# Altium PCB ControlBoard_PCB.PcbDoc (part 1 of 2)
Units mil, origin at the board's own origin, x right, y up, seen from the top; angles counter-clockwise.
Board outline 1629.92 x 1653.54 mil, 2 copper layers (Top Layer, Bottom Layer), stack 57 mil thick; 87 components, 76 nets, 349 pads, 144 vias.
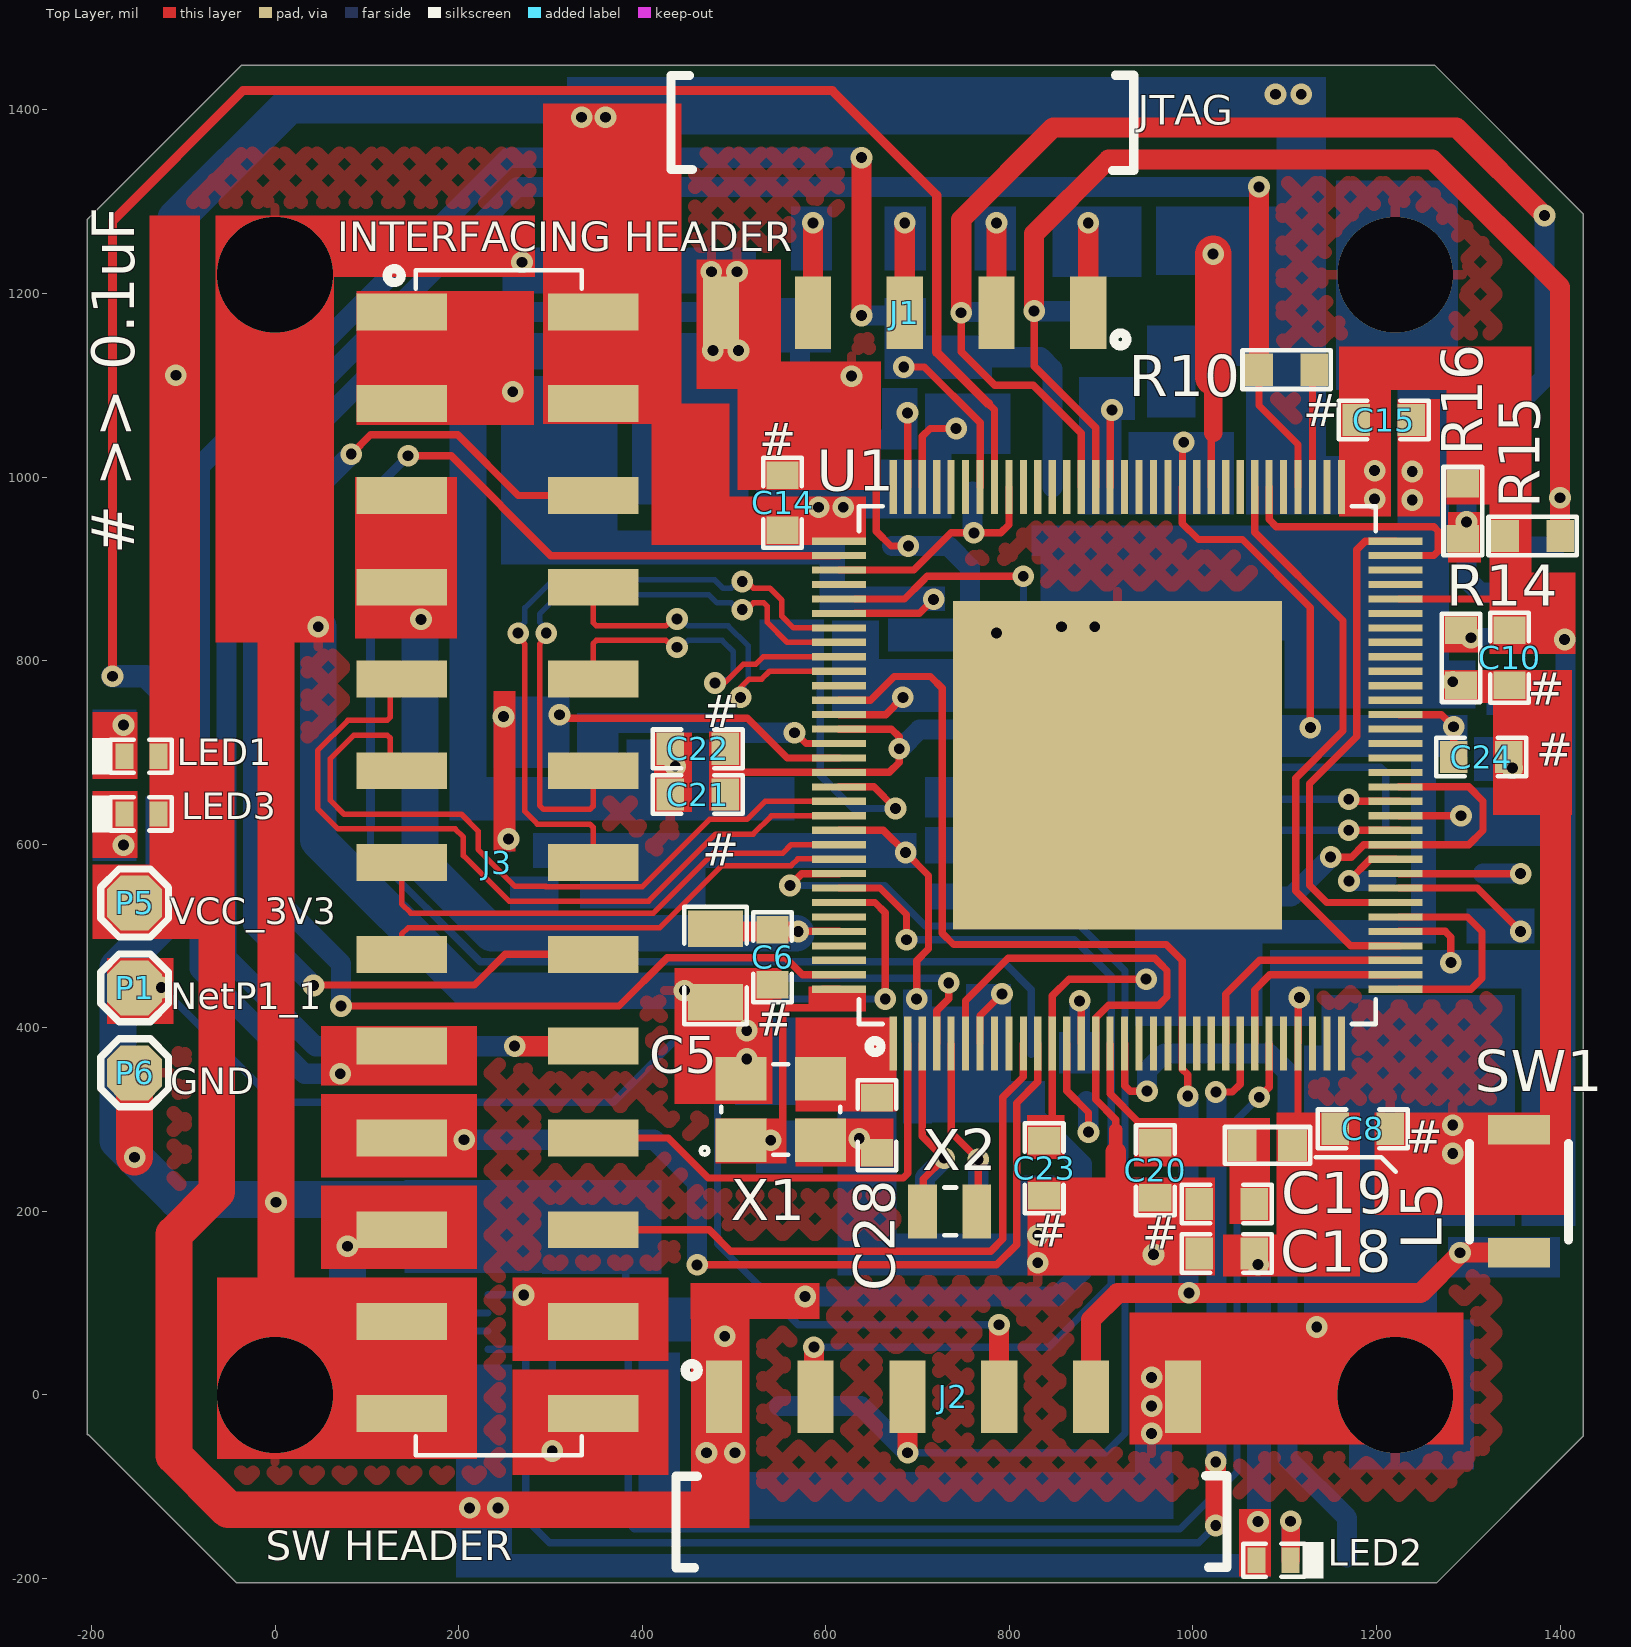
[diagram p0: Top Layer view]
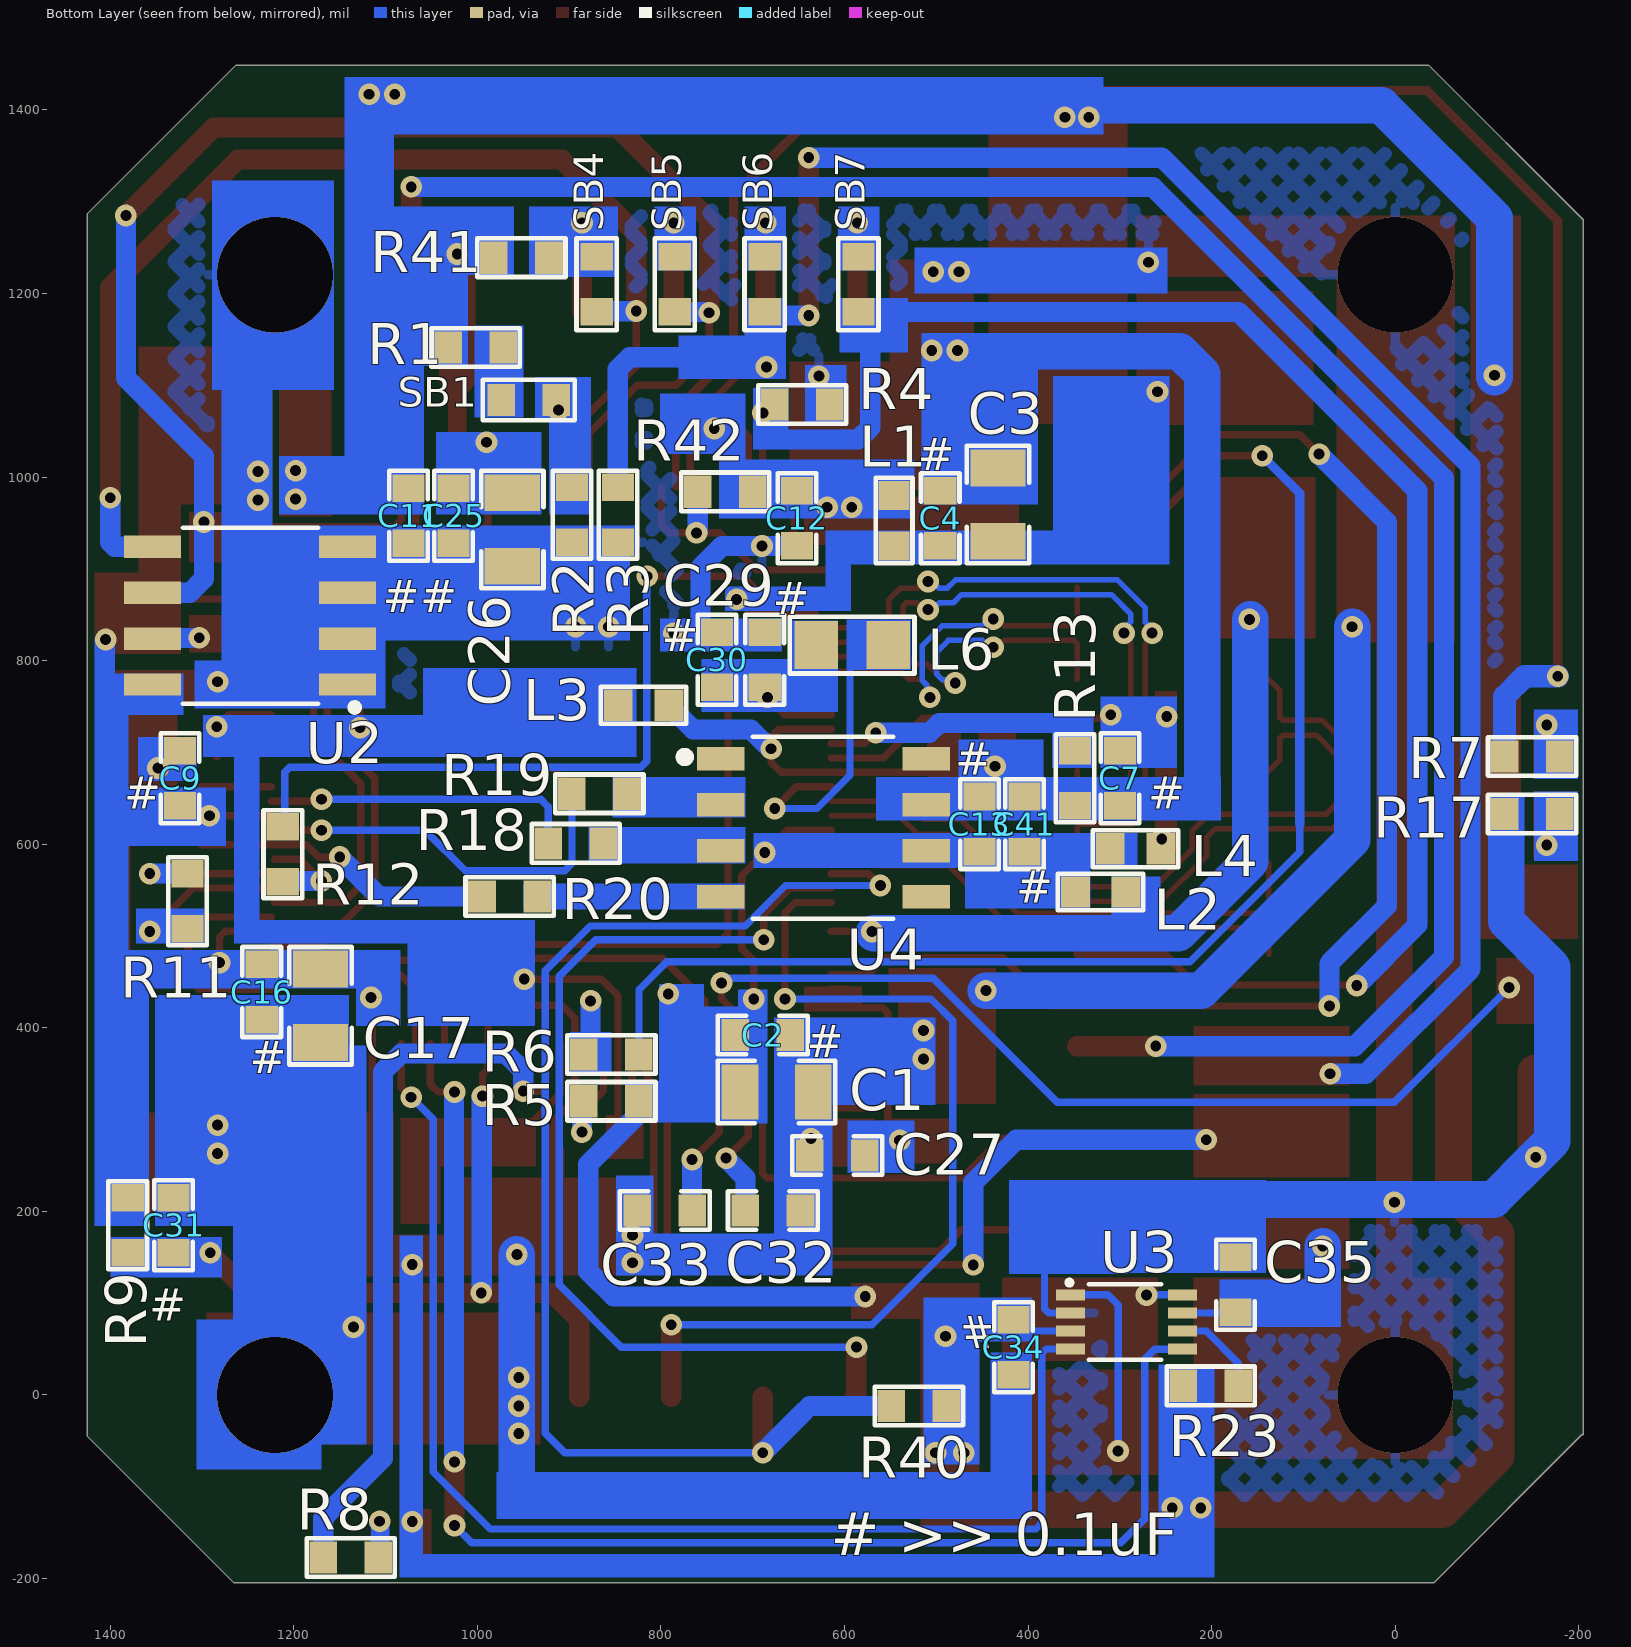
[diagram p1: Bottom Layer view, seen from below]
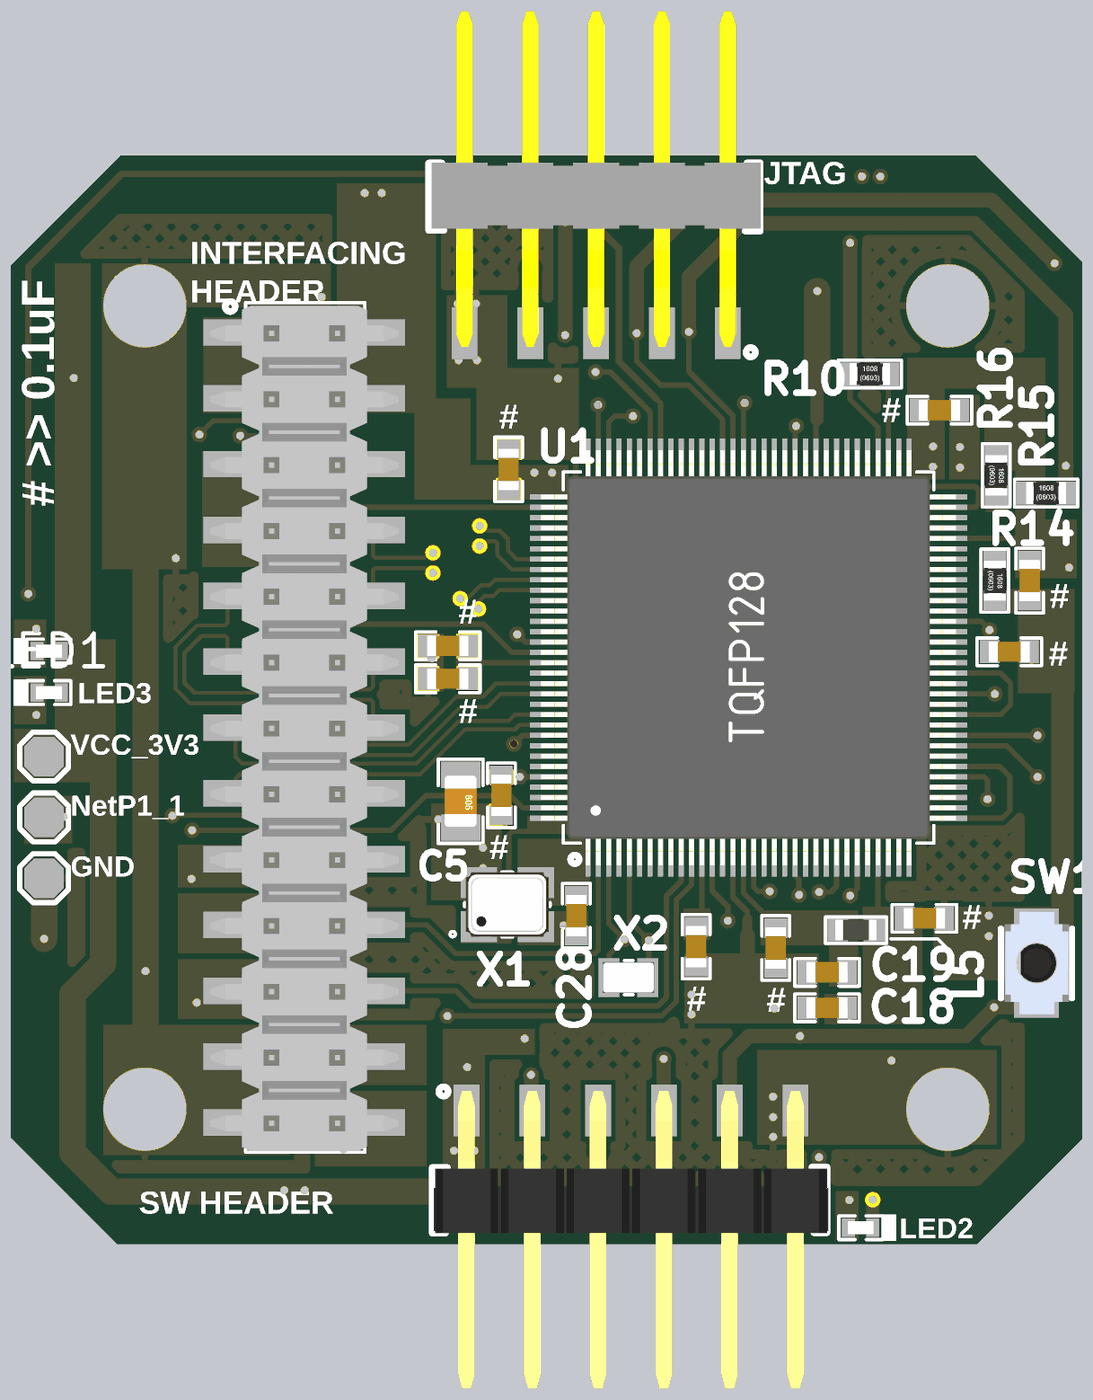
[diagram p3: 3D render of the assembled board from above, using the file's embedded part models]
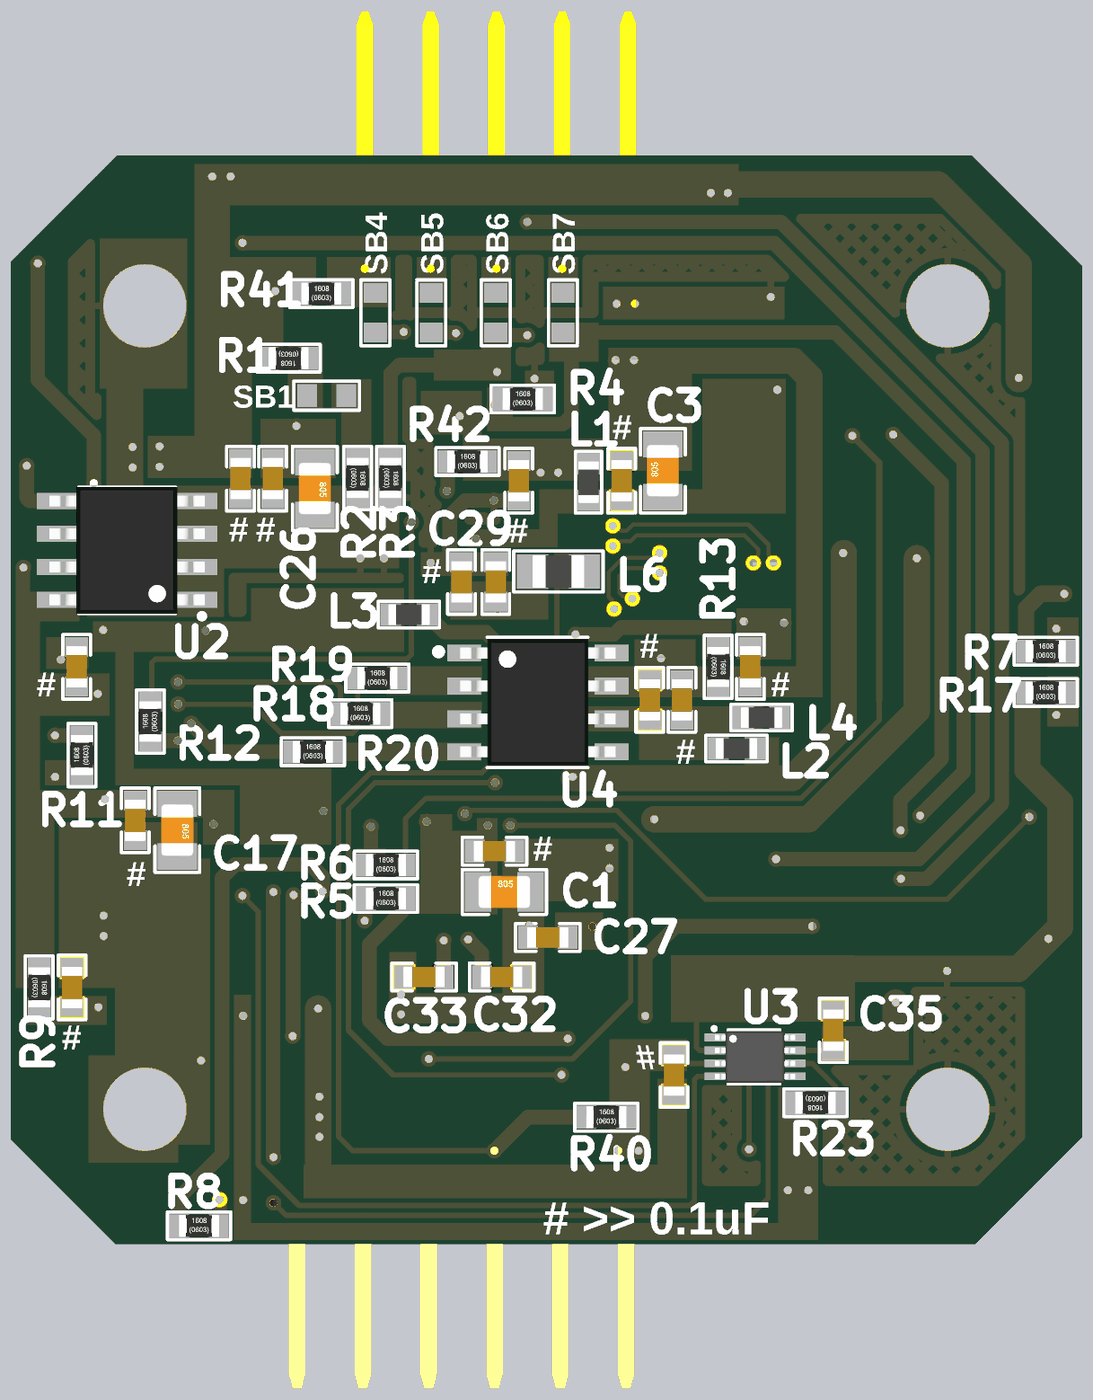
[diagram p4: 3D render of the assembled board from below, using the file's embedded part models]

## Layer stack, top to bottom
Top Solder: solder mask 3, Solder Resist, Dk 3.5
Top Layer: signal copper 10
Dielectric 1: dielectric 37, FR-4, Dk 4.8
Bottom Layer: signal copper 10
Bottom Solder: solder mask 3, Solder Resist, Dk 3.5

## Board outline
-204.72,-43.35 -204.72,1280.28 -36.18,1448.82 1263.11,1448.82 1425.2,1286.73 1425.2,-44.8 1265.28,-204.72 -41.8,-204.72 -203.18,-43.35

## Design rules (kind name [scope] priority, off if disabled: settings)
Clearance Clearance_2 [InDifferentialPairClass('EtherCAT_B_Lines')] p1: gap=7 ignorepadtopadclearanceinfootprint=FALSE except(0: Arc-Hole Track-Hole SMDPad-Hole THPad-Hole Via-Hole Fill-Hole Poly-Hole Region-Hole Text-Hole; 3: Arc-SMDPad Track-SMDPad SMDPad-SMDPad)
Clearance Clearance_1 [InDifferentialPairClass('EtherCAT_A_Lines')] p2: gap=7 ignorepadtopadclearanceinfootprint=FALSE except(0: Arc-Hole Track-Hole SMDPad-Hole THPad-Hole Via-Hole Fill-Hole Poly-Hole Region-Hole Text-Hole; 3: Arc-SMDPad Track-SMDPad SMDPad-SMDPad)
Clearance [All] p3: gap=7 ignorepadtopadclearanceinfootprint=FALSE except(0: Arc-Hole Track-Hole SMDPad-Hole THPad-Hole Via-Hole Fill-Hole Poly-Hole Region-Hole Text-Hole; 3: Arc-SMDPad Track-SMDPad SMDPad-SMDPad)
ComponentClearance [All] p1: gap=4 collisioncheckmode=3 verticalgap=4 showdistances=FALSE
DiffPairsRouting DiffPairsRouting_1 [InDifferentialPairClass('EtherCAT_B_Lines')] p1: maxlimit=10 minlimit=10 mostfreqgap=10 toplayer_minwidth=6 toplayer_maxwidth=22 toplayer_prefwidth=10 bottomlayer_minwidth=6 bottomlayer_maxwidth=22 bottomlayer_prefwidth=10 maxuncoupledlength=500
DiffPairsRouting [InDifferentialPairClass('EtherCAT_A_Lines')] p2: maxlimit=10 minlimit=10 mostfreqgap=10 toplayer_minwidth=6 toplayer_maxwidth=22 toplayer_prefwidth=10 bottomlayer_minwidth=6 bottomlayer_maxwidth=22 bottomlayer_prefwidth=10 maxuncoupledlength=500
HoleSize [All] p1: absolutevalues=TRUE maxlimit=1000 minlimit=1 maxpercent=80.000 minpercent=20.000
HoleToHoleClearance [All] p1: gap=0 allowstackedmicrovias=TRUE
MatchedLengths "Schematic Matched Net Lengths_1" [InNetClass('EtherCAT_A')] p1: tolerance=1000 checknetsindiffpair=FALSE checkdiffpairvsdiffpair=TRUE checkxsignals=TRUE checkothers=TRUE
MatchedLengths "Schematic Matched Net Lengths" [InNetClass('EtherCAT_B')] p2: tolerance=1000 checknetsindiffpair=FALSE checkdiffpairvsdiffpair=TRUE checkxsignals=TRUE checkothers=TRUE
MaxMinImpedance "Schematic Impedance Constraint_1" [InNetClass('EtherCAT_B')] p1: minimum=90.00 maximum=110.0
MaxMinImpedance "Schematic Impedance Constraint" [InNetClass('EtherCAT_A')] p2: minimum=90.00 maximum=110.0
MinimumSolderMaskSliver [All] p1: minsoldermaskwidth=0
PolygonConnect [All] p1: connectstyle=Relief reliefconductorwidth=10 reliefentries=4 polygonreliefangle="90 Angle" airgapwidth=10
RoutingVias [All] p1: holewidth=11.81 width=23.62 viastyle="Through Hole" minholewidth=11.81 minwidth=23.62 maxholewidth=11.81 maxwidth=23.62
SilkToSilkClearance [All] p1: silktosilkclearance=0
SilkToSolderMaskClearance [IsPad] p1: minsilkscreentomaskgap=0 clearancetoexposedcopper=TRUE
SolderMaskExpansion SolderMaskExpansion_1 [IsVia] p1: expansion=4 istentingtop=FALSE soldermaskfromhole=TRUE
SolderMaskExpansion [Not IsVia] p2: expansion=4 istentingtop=FALSE
Width [All] p1: maxlimit=40 minlimit=8 preferedwidth=22
23 further rules are at their usual default settings.

## Classes and differential pairs
differential pair class EtherCAT_B_Lines: RXB TXB
differential pair class EtherCAT_A_Lines: RXA TXA
net class EtherCAT_B: RXB_N RXB_P TXB_N TXB_P
net class EtherCAT_A: NetU1_59 RXA_N RXA_P TXA_N TXA_P
component class U_Level-Shifter-Section: C34 C35 R23 U3
component class U_Encoder-Section: C41 R18 R19 R20 U4
component class U_Controller-Part-2: C32 C33 L6 R10 R11 R12 R13 R14 R15 R16 U2 X2
component class U_Controller-Part-1: C1 C2 C3 C4 C5 C6 C7 C8 C9 C10 C11 C12 C13 C14 C15 C16 C17 C18 C19 C20 C21 C22 C23 C24 C25 C26 C27 C28 C29 C30 C31 L1 L2 L3 L4 L5 LED1 LED2 LED3 P1 R1 R2 R3 R4 R5 R6 R7 R8 R9 R17 R42 SB1 SW1 U1 X1
component class U_Connector-Section: J1 J2 J3 P5 P6 R40 R41 SB4 SB5 SB6 SB7
differential pair TXB: +TXB_P -TXB_N
differential pair TXA: +TXA_P -TXA_N
differential pair RXB: +RXB_P -RXB_N
differential pair RXA: +RXA_P -RXA_N

## Components (designator, comment, footprint, x,y, rotation, side; value= is the part's Value field where it differs from the comment)
C1 "1uF" Cap0805 674,330 r180 bottom locked
C2 "0.1uF" Cap0603#1 689,392 r180 bottom locked
C3 "1uF" Cap0805 433,970 r90 bottom
C4 "0.1uF" Cap0603#2 495.72,955 r90 bottom
C5 "1uF" Cap0805 480,467.88 r270 top locked
C6 "0.1uF" Cap0603#2 542,476.88 r270 top locked
C7 "0.1uF" Cap0603#1 300,672 r270 bottom locked
C8 "0.1uF" Cap0603#1 1185,290 r0 top locked
C9 "0.1uF" Cap0603#1 1324,672 r90 bottom locked
C10 "0.1uF" Cap0603#1 1345,803 r270 top locked
C11 "0.1uF" Cap0603#1 1075,958 r270 bottom
C12 "0.1uF" Cap0603#1 652,955 r270 bottom
C13 "0.1uF" Cap0603#2 453,622 r90 bottom locked
C14 "0.1uF" Cap0603#2 553,972 r90 top locked
C15 "0.1uF" Cap0603#1 1208,1062 r0 top locked
C16 "0.1uF" Cap0603#1 1235,439 r270 bottom locked
C17 "10uF" Cap0805 1171,424 r270 bottom locked
C18 "4.7uF" Cap0603#1 1037,154 r180 top locked
C19 "4.7uF" Cap0603#1 1037,208 r180 top locked
C20 "0.1uF" Cap0603#1 959,245 r270 top locked
C21 "0.1uF" Cap0603#2 460.5,654 r180 top locked
C22 "0.1uF" Cap0603#2 460.5,704 r180 top locked
C23 "0.1uF" Cap0603#1 838,247 r270 top locked
C24 "0.1uF" Cap0603#1 1314,695 r0 top locked
C25 "0.1uF" Cap0603#1 1026,958 r270 bottom
C26 "1uF" Cap0805 962,943 r270 bottom
C27 "10pF" Cap0603#1 608,261 r180 bottom locked
C28 "10pF" Cap0603#1 656,294 r90 top locked
C29 "4.7uF" Cap0603#1 687,801 r90 bottom locked
C30 "0.1uF" Cap0603#1 739,801 r90 bottom locked
C31 "0.1uF" Cap0603#2 1331,185 r90 bottom locked
C32 "10pF" Cap0603#2 678,201 r0 bottom locked
C33 "10pF" Cap0603#2 796,201 r180 bottom locked
C34 "0.1uF" Cap0603#2 416,52 r270 bottom locked
C35 "0.1uF" Cap0603#2 174,120 r90 bottom locked
C41 "0.1uF" Cap0603#1 404,622 r90 bottom locked
J1 "PH254P1x12SMRA-100" "HDR1X5 SMD" 686,1179 r180 top locked
J2 "PH254P1x12SMRA-100" "HDR1X6 SMD" 739,-2 r0 top locked
J3 "95278-101A26LF" 95278-101A26LF 242.33,580 r270 top locked
L1 "MLB1608-201P1A(f)" MLB1608-201P1A(f) 546,952.48 r270 bottom
L2 "MLB1608-201P1A(f)" MLB1608-201P1A(f) 321,548 r180 bottom locked
L3 "MLB1608-201P1A(f)" MLB1608-201P1A(f) 819,751.44 r180 bottom locked
L4 "MLB1608-201P1A(f)" MLB1608-201P1A(f) 283,595 r180 bottom locked
L5 "MLB1608-201P1A(f)" MLB1608-201P1A(f) 1081,272 r180 top locked
L6 "MGFL2012F100MT-LF" Ind0805 591.63,817 r0 bottom locked
LED1 "16-213/GHC-YR1S1/3T" "LED 0402" -145.5,696 r180 top locked
LED2 "16-213/GHC-YR1S1/3T" "LED 0402" 1088,-180 r0 top locked
LED3 "16-213/GHC-YR1S1/3T" "LED 0402" -145.5,633 r180 top locked
P1 "Test Point" "TEST POINT" -153,443.5 r0 top locked
P5 "Test Point" "TEST POINT" -153,536 r180 top locked
P6 "Test Point" "TEST POINT" -153,351 r180 top locked
R1 "10K" Res0603 1002,1141 r180 bottom locked
R2 "10K" Res0603 897,959 r90 bottom
R3 "10K" Res0603 847,959 r90 bottom
R4 "10K" Res0603 646,1079 r0 bottom locked
R5 "10K" Res0603 854,320 r0 bottom locked
R6 "33R" Res0603 854,371 r0 bottom locked
R7 "330R" Res0603 -149,695.72 r0 bottom locked
R8 "1K" Res0603 1138,-177 r0 bottom locked
R9 "10K" Res0603 1381,185 r90 bottom locked
R10 "1K" Res0603 1102,1117 r180 top locked
R11 "33R" Res0603 1316,538 r270 bottom locked
R12 "33R" Res0603 1212,589 r270 bottom locked
R13 "12.1K" Res0603 349,672 r90 bottom locked
R14 "10K" Res0603 1292,803 r90 top locked
R15 "10K" Res0603 1370,936 r180 top locked
R16 "10K" Res0603 1294,963 r90 top locked
R17 "1K" Res0603 -149,633 r0 bottom locked
R18 "100R" Res0603 893,601 r0 bottom locked
R19 "100R" Res0603 867,655 r0 bottom locked
R20 "470R" Res0603 965,543 r0 bottom locked
R23 "10K" Res0603 201,10 r180 bottom locked
R40 "1K" Res0603 519,-12 r0 bottom locked
R41 "10K" Res0603 952,1239 r0 bottom locked
R42 "10K" Res0603 730,984 r0 bottom locked
SB1 "Solder Bridge" "Solder Bridge" 944,1084 r0 bottom locked
SB4 "Solder Bridge" "Solder Bridge" 870,1210 r90 bottom locked
SB5 "Solder Bridge" "Solder Bridge" 785,1210 r90 bottom locked
SB6 "Solder Bridge" "Solder Bridge" 687,1210 r90 bottom locked
SB7 "Solder Bridge" "Solder Bridge" 585,1210 r90 bottom locked
SW1 "B3U-1000P" B3U-1000P 1355.28,222.03 r90 top locked
U1 "LAN9255/ZMX019" LAN9255/ZMX019 917.67,686.12 r90 top locked
U2 "CAT24C256WI-GT3" CAT24C256WI-GT3 1247.7,849 r0 bottom locked
U3 "TXB0102DCUT" TXB0102DCUT 293.02,79.47 r180 bottom locked
U4 "TLE5012BE5000FUMA1" TLE5012BE5000FUMA1 623,618 r180 bottom locked
X1 "C3E-25.000-8-1015-X-M" C3E-25.000-8-1015-X-M 551,311 r0 top locked value=Custom
X2 "CM8V-T1A-32.768KHZ-6PF-20PPM-TA-QC" CM8V-T1A-32.768KHZ-6PF-20PPM-TA-QC 735,200 r0 top locked

## Footprints (in the part's own frame and the unit in brackets; to place one, negate y for a bottom-side part, rotate by r counter-clockwise, add the part's x,y. Pads: shape width x height; smd on the part's side, far side on the other; paste and mask are expansions set on the pad)
95278-101A26LF [mm]
  rect 1.02x2.5 smd: 1(-15.24,-2.65) 2(-15.24,2.65) 3(-12.7,-2.65) 4(-12.7,2.65) 5(-10.16,-2.65) 6(-10.16,2.65) 7(-7.62,-2.65) 8(-7.62,2.65) 9(-5.08,-2.65) 10(-5.08,2.65) 11(-2.54,-2.65) 12(-2.54,2.65) 13(0,-2.65) 14(0,2.65) 15(2.54,-2.65) 16(2.54,2.65) 17(5.08,-2.65) 18(5.08,2.65) 19(7.62,-2.65) 20(7.62,2.65) 21(10.16,-2.65) 22(10.16,2.65) 23(12.7,-2.65) 24(12.7,2.65) 25(15.24,-2.65) 26(15.24,2.65)
  silkscreen extent -16.44,-3.05 16.4,2.34, body extent -16.27,-3.63 16.35,3.65, height 9.66
B3U-1000P [mm] "SWITCH TACTILE SPST-NO 0.05A 12V"
  rect 0.82x1.72 smd: 1(-1.7,0) 2(1.7,0)
  silkscreen extent -1.35,-1.37 1.32,1.37, body extent -2,-1.26 2,1.24, height 1.6
C3E-25.000-8-1015-X-M [mm]
  rect 1.4x1.2 smd: 1(-1.1,-0.85) 2(1.1,-0.85) 3(1.1,0.85) 4(-1.1,0.85)
  silkscreen extent -2.21,-1.25 1.65,1.25, body extent -1.6,-1.25 1.6,1.25, height 0.82
Cap0603#1 [mil]
  rect 30x35 smd: 1(-30,0) 2(30,0)
  silkscreen extent -49,-21 49,21, body extent -32,-16 31,16, height 34
Cap0603#2 [mil]
  rect 30x35 smd mask+2.36: 1(-30,0) 2(30,0)
  silkscreen extent -49,-21 49,21, body extent -32,-16 31,16, height 34
Cap0805 [mil] "SMD 0805"
  rect 40x60 smd: 1(-40,0) 2(40,0)
  silkscreen extent -64,-34 64,34, body extent -39,-25 39,25, height 30
CAT24C256WI-GT3 [mm]
  rect 1.57x0.62 smd: 1(-2.7,1.905) 2(-2.7,0.635) 3(-2.7,-0.635) 4(-2.7,-1.905) 5(2.7,-1.905) 6(2.7,-0.635) 7(2.7,0.635) 8(2.7,1.905)
  silkscreen extent -3,-2.44 1.85,2.64, body extent -3,-2.45 3,2.45, height 1.75
CM8V-T1A-32.768KHZ-6PF-20PPM-TA-QC [mm]
  rect 0.8x1.5 smd: 1(-0.75,0) 2(0.75,0)
  silkscreen extent -0.15,-0.66 0.18,0.66, body extent -1,-0.6 1,0.6, height 0.35
"HDR1X5 SMD" [mm]
  rect 1x2 smd: 1(-5.08,0) 2(-2.54,0) 3(0,0) 4(2.54,0) 5(5.08,0)
  silkscreen extent -6.34,-6.57 6.46,0.92, body extent -6.35,-12.42 6.35,0.53, height 3.05
"HDR1X6 SMD" [mm]
  rect 1x2 smd: 1(-6.35,0) 2(-3.81,0) 3(-1.27,0) 4(1.27,0) 5(3.81,0) 6(6.35,0)
  silkscreen extent -7.67,-4.73 7.57,0.92, body extent -7.62,-10.73 7.62,0.76, height 2.5
Ind0805 [mm] "Inductor 0805"
  rect 1.2x1.32 smd: 1(-1,0) 2(1,0)
  silkscreen extent -1.72,-0.79 1.73,0.79, body extent -1,-0.62 1,0.63, height 0.47
LAN9255/ZMX019 [mm]
  rect 1.5x0.2 smd: 1(-7.7,6.2) 2(-7.7,5.8) 3(-7.7,5.4) 4(-7.7,5) 5(-7.7,4.6) 6(-7.7,4.2) 7(-7.7,3.8) 8(-7.7,3.4) 9(-7.7,3) 10(-7.7,2.6) 11(-7.7,2.2) 12(-7.7,1.8) 13(-7.7,1.4) 14(-7.7,1) 15(-7.7,0.6) 16(-7.7,0.2) 17(-7.7,-0.2) 18(-7.7,-0.6) 19(-7.7,-1) 20(-7.7,-1.4) 21(-7.7,-1.8) 22(-7.7,-2.2) 23(-7.7,-2.6) 24(-7.7,-3) 25(-7.7,-3.4) 26(-7.7,-3.8) 27(-7.7,-4.2) 28(-7.7,-4.6) 29(-7.7,-5) 30(-7.7,-5.4) 31(-7.7,-5.8) 32(-7.7,-6.2) 65(7.7,-6.2) 66(7.7,-5.8) 67(7.7,-5.4) 68(7.7,-5) 69(7.7,-4.6) 70(7.7,-4.2) 71(7.7,-3.8) 72(7.7,-3.4) 73(7.7,-3) 74(7.7,-2.6) 75(7.7,-2.2) 76(7.7,-1.8) 77(7.7,-1.4) 78(7.7,-1) 79(7.7,-0.6) 80(7.7,-0.2) 81(7.7,0.2) 82(7.7,0.6) 83(7.7,1) 84(7.7,1.4) 85(7.7,1.8) 86(7.7,2.2) 87(7.7,2.6) 88(7.7,3) 89(7.7,3.4) 90(7.7,3.8) 91(7.7,4.2) 92(7.7,4.6) 93(7.7,5) 94(7.7,5.4) 95(7.7,5.8) 96(7.7,6.2)
  rect 0.2x1.5 smd: 33(-6.2,-7.7) 34(-5.8,-7.7) 35(-5.4,-7.7) 36(-5,-7.7) 37(-4.6,-7.7) 38(-4.2,-7.7) 39(-3.8,-7.7) 40(-3.4,-7.7) 41(-3,-7.7) 42(-2.6,-7.7) 43(-2.2,-7.7) 44(-1.8,-7.7) 45(-1.4,-7.7) 46(-1,-7.7) 47(-0.6,-7.7) 48(-0.2,-7.7) 49(0.2,-7.7) 50(0.6,-7.7) 51(1,-7.7) 52(1.4,-7.7) 53(1.8,-7.7) 54(2.2,-7.7) 55(2.6,-7.7) 56(3,-7.7) 57(3.4,-7.7) 58(3.8,-7.7) 59(4.2,-7.7) 60(4.6,-7.7) 61(5,-7.7) 62(5.4,-7.7) 63(5.8,-7.7) 64(6.2,-7.7) 97(6.2,7.7) 98(5.8,7.7) 99(5.4,7.7) 100(5,7.7) 101(4.6,7.7) 102(4.2,7.7) 103(3.8,7.7) 104(3.4,7.7) 105(3,7.7) 106(2.6,7.7) 107(2.2,7.7) 108(1.8,7.7) 109(1.4,7.7) 110(1,7.7) 111(0.6,7.7) 112(0.2,7.7) 113(-0.2,7.7) 114(-0.6,7.7) 115(-1,7.7) 116(-1.4,7.7) 117(-1.8,7.7) 118(-2.2,7.7) 119(-2.6,7.7) 120(-3,7.7) 121(-3.4,7.7) 122(-3.8,7.7) 123(-4.2,7.7) 124(-4.6,7.7) 125(-5,7.7) 126(-5.4,7.7) 127(-5.8,7.7) 128(-6.2,7.7)
  rect 9.1x9.1 smd: 129(0,0)
  silkscreen extent -7.95,-7.15 7.16,7.15, body extent -8.01,-8.01 8.01,8.01, height 1.1
"LED 0402" [mm] "Green 520~535nm 0402 Light Emitting Diodes (LED) RoHS"
  rect 0.5x0.7 smd: 1(-0.47,0) 2(0.47,0)
  silkscreen extent -0.84,-0.51 1.37,0.51, body extent -0.5,-0.25 0.5,0.25, height 0.5
MLB1608-201P1A(f) [mm] "200O @ 100MHz 1 1A 300mO 0603 Ferrite Beads"
  rect 0.8x0.864 smd: 1(-0.7,0) 2(0.7,0)
  silkscreen extent -1.19,-0.51 1.18,0.51, body extent -0.8,-0.4 0.8,0.4, height 0.79
Res0603 [mil]
  rect 30x35 smd: 1(-30,0) 2(30,0)
  silkscreen extent -48,-21 48,21, body extent -31,-17 31,17, height 18
"Solder Bridge" [mil] "Solder Bridge ON"
  rect 30x35 smd: 1(-30,0) 2(30,0)
  silkscreen extent -50,-22 50,22
"TEST POINT" [mil]
  oct 60x60 smd: 1(0,0)
  silkscreen extent -37,-37 37,37
TLE5012BE5000FUMA1 [mm] "SENSOR ANGLE 360DEG SMD"
  rect 1.31x0.65 smd: 1(-2.845,1.905) 2(-2.845,0.635) 3(-2.845,-0.635) 4(-2.845,-1.905) 5(2.845,-1.905) 6(2.845,-0.635) 7(2.845,0.635) 8(2.845,1.905)
  silkscreen extent -3.96,-2.51 1.93,2.51, body extent -3,-2.45 3,2.45, height 1.75
TXB0102DCUT [mm]
  rect 0.8x0.3 smd: 1(-1.55,0.75) 2(-1.55,0.25) 3(-1.55,-0.25) 4(-1.55,-0.75) 5(1.55,-0.75) 6(1.55,-0.25) 7(1.55,0.25) 8(1.55,0.75)
  silkscreen extent -1.61,-1.04 0.97,1.13, body extent -1.55,-1 1.55,1, height 0.9

## Part data
C1 C3 C5 C26: library part GCM21BC72A105KE36L, "CAP CER 1UF 100V X7S 0805", Case Code (Imperial)=0805, Case Code (Metric)=2012, Manufacturer=Murata, Max Operating Temperature=125°C, Min Operating Temperature=-55°C, Ratings=AEC-Q200, Supplier Part Number 1=490-14436-1-ND, Tolerance=10%, Voltage Rating=100V, Capacitance=1uF, Case/Package=0805, Category="Ceramic Capacitors", ComponentLink1Description=http://search.murata.co.jp/Ceramy/image/img/A01X/partnumbering_e_02.pdf?src-supplier=Digi-Key, ComponentLink1URL=http://search.murata.co.jp/Ceramy/image/img/A01X/partnumbering_e_02.pdf?src-supplier=Digi-Key, Manufacturer Part Number=GCM21BC72A105KE36L, Mount="Surface Mount", Packaging="Cut Tape", Pricing 1="1=0.48000, 10=0.34100, 50=0.25800, 100=0.22480, 500=0.16650, 1000=0.14152 (USD)", RoHS=Yes, RoHS Compliant=Yes, Stock 1=179138, Supplier 1=Digi-Key
C2 C4 C6 C7 C8 C9 C10 C11 C12 C13 C14 C15 C16 C20 C21 C22 C23 C24 C25 C30 C31 C34 C35 C41: library part CC0603KRX7R0BB104, "CAP CER 0.1UF 100V X7R 0603", Capacitance=100nF, Case Code (Imperial)=0603, Case Code (Metric)=1608, Dielectric=X7R, Manufacturer=Yageo, Max Operating Temperature=125°C, Min Operating Temperature=-55°C, Package Quantity=4000, Resistor Type=Ceramic, Supplier Part Number 1=311-1523-1-ND, Tolerance=10%, Voltage Rating=100V, Case/Package=0603, Category="Ceramic Capacitors", ComponentLink1Description=https://datasheet.ciiva.com/6277/mlccorderingcode-6277030.pdf?src-supplier=Digi-Key, ComponentLink1URL=https://datasheet.ciiva.com/6277/mlccorderingcode-6277030.pdf?src-supplier=Digi-Key, ComponentLink2Description=https://datasheet.ciiva.com/6277/mlccorderingcode-6277081.pdf?src-supplier=Digi-Key, ComponentLink2URL=https://datasheet.ciiva.com/6277/mlccorderingcode-6277081.pdf?src-supplier=Digi-Key, ComponentLink3Description=https://datasheet.ciiva.com/6277/mlccorderingcode-6277082.pdf?src-supplier=Digi-Key, ComponentLink3URL=https://datasheet.ciiva.com/6277/mlccorderingcode-6277082.pdf?src-supplier=Digi-Key, Depth=0.8mm, Lead Free="Lead Free", Length=0.063inch, Manufacturer Part Number=CC0603KRX7R0BB104, Mount="Surface Mount", Packaging="Tape and Reel", Pricing 1="1=0.19000, 10=0.13500, 50=0.07680, 100=0.06370, 500=0.04466, 1000=0.03696 (USD)", RoHS=Yes, RoHS Compliant=Yes, Series=CC, Stock 1=60476, Supplier 1=Digi-Key, Termination=SMD/SMT, Thickness=0.035inch, Voltage Rating (DC)=100V, Weight=7.1E-05oz, Width=0.031inch
C17: library part GRM21BR61H106ME43L, "CAP CER 10UF 50V X5R 0805", Manufacturer=Murata, Supplier Part Number 1=490-18664-1-ND, Category="Ceramic Capacitors", Manufacturer Part Number=GRM21BR61H106ME43L, Pricing 1="1=0.44000, 10=0.30700, 50=0.21500, 100=0.18420, 500=0.13818, 1000=0.11668 (USD)", RoHS=Yes, Stock 1=26, Supplier 1=Digi-Key
C18 C19 C29: library part C1608X5R1E475M080AC, "CAP CER 4.7UF 25V X5R 0603", Case Code (Imperial)=0603, Case Code (Metric)=1608, Dielectric=X5R, Dielectric Material=Ceramic, Manufacturer=TDK, Max Operating Temperature=85°C, Min Operating Temperature=-55°C, Package Quantity=1, Supplier Part Number 1=810-C1608X5R1E475M, Tolerance=20%, Voltage Rating=25V, Capacitance=4.7uF, Case/Package=0603, ComponentLink1Description=http://www.yageo.com/NewPortal/_en/search/productDocs.jsp?YageoPartNumber=AC0603JRNPO0BN470&src-supplier=Digi-Key, ComponentLink1URL=http://www.yageo.com/NewPortal/_en/search/productDocs.jsp?YageoPartNumber=AC0603JRNPO0BN470&src-supplier=Digi-Key, ComponentLink2Description=https://www.verical.com/server-webapp/html/getDatasheet?partID=726745&src-supplier=Verical, ComponentLink2URL=https://www.verical.com/server-webapp/html/getDatasheet?partID=726745&src-supplier=Verical, Composition=Ceramic, Depth=0.8mm, Height=0.8mm, Lead Free="Lead Free", Length=1.6mm, Manufacturer Part Number=C1608X5R1E475M080AC, Mount="Surface Mount", Packaging="Tape and Reel", Pricing 1="1=0.29, 10=0.237, 100=0.142, 500=0.106, 1000=0.09, 4000=0.076, 8000=0.072, 24000=0.07, 48000=0.067 (USD)", Radiation Hardening=No, REACH SVHC="No SVHC", Stock 1=40236, Supplier 1=Mouser, Termination=SMD/SMT, Thickness=0.039inch, Voltage Rating (DC)=25V, Weight=7.1E-05oz, Width=0.031inch
C27 C28 C32 C33: library part 06035A100JAT2A, "CAP CER 10PF 50V C0G/NP0 0603", Case/Package=0603, Dielectric=C0G, Insulation Resistance=100GR, Manufacturer="Kyocera AVX", Manufacturer Part Number=06035A100JAT2A/4K, Max Operating Temperature=125°C, Min Operating Temperature=-55°C, Supplier Part Number 1=478-1163-1-ND, Temperature Coefficient=30ppm/°C, Tolerance=5%, Voltage=50V, Capacitance=10pF, Depth=0.81mm, Height=0.9mm, Lead Free="Lead Free", Length=1.6mm, Mount="Surface Mount", Number of Pins=2, Packaging="Cut Tape", Pricing 1="1=0.1, 10=0.05, 50=0.0272, 100=0.0222, 500=0.01586, 1000=0.01246 (USD)", REACH SVHC="No SVHC", Stock 1=196463, Supplier 1=Digi-Key, Thickness=864um, Voltage Rating (DC)=50V, Width=810um
J1: "5 POS 2.54mm Pin Header Male single row Right Angle SMD", Manufacturer=RTLECS, Pin shape="Square pin", Pitch=2.54
J2: library part PH254P1x12SMRA-100_1, "6 POS 2.54mm Pin Header Male single row Right Angle SMD", Manufacturer=RTLECS, Pin shape="Square pin", Pitch=2.54
J3: "CONN HEADER SMD 26POS 2.54MM", Manufacturer="Amphenol ICC (FCI)", Package=Custom, ComponentLink1Description="New link", ComponentLink1URL=https://www.digikey.com/en/products/detail/amphenol-icc-fci/95278-101A26LF/1488594, Manufacturer Part No=95278-101A26LF
L1 L2 L3 L4 L5: "200Ω @ 100MHz 1 1A 300mΩ 0603 Ferrite Beads", Current Rating (Max)=1A, DC Resistance (DCR) (Max)=300mΩ, Impedance @ Frequency="200Ω @ 100MHz", Manufacturer=Meled, Number of Lines=1
L6: "IND SMD 10uH 500mA 0805", DC Resistance (DCR)=320mΩ, Inductance=10uH, Manufacturer=microgate, Rated Current=500mA, Tolerance=±20%
LED1 LED2 LED3: "Green 520~535nm 0402 Light Emitting Diodes (LED) RoHS", Illumination Color=Green, Manufacturer="Everlight Elec", Package=0402, Dominant Wavelength / Coordinate rank=520~535nm, Luminous Intensity (IF=20mA)=112~285mcd, Mounting Type="Surface Mount"
P1 P5 P6: library part "TEST POINT", "Test Point ON"
R1 R2 R3 R4 R5 R9 R14 R15 R16 R23 R41 R42: library part AC0603JR-0710KL, "RES SMD 10K OHM 5% 1/10W 0603", Case Code (Imperial)=0603, Case Code (Metric)=1608, Manufacturer=Yageo, Max Operating Temperature=155°C, Max Power Dissipation=100mW, Min Operating Temperature=-55°C, Package Quantity=1, Resistance=10kR, Resistor Type="Thick Film", Supplier Part Number 1=1029044, Temperature Coefficient=100ppm/°C, Tolerance=5%, Voltage Rating=50V, Case/Package=0603, Category="Chip SMD Resistors", ComponentLink1Description=https://datasheet.ciiva.com/5562/pyu-ac-51-rohs-l-2-5562553.pdf?src-supplier=Mouser, ComponentLink1URL=https://datasheet.ciiva.com/5562/pyu-ac-51-rohs-l-2-5562553.pdf?src-supplier=Mouser, Construction=Rectangular, Depth=0.8mm, Features="Moisture Resistant,Automotive AEC-Q200,Anti-Sulfur", Height=0.022inch, Lead Free="Lead Free", Length=0.063inch, Manufacturer Part Number=AC0603JR-0710KL, Military Standard=Not, Number of Terminations=2, Packaging="Tape and Reel", Power Rating=100mW, Pricing 1="5000=0.00540 (USD)", RoHS=Yes, RoHS Compliant=Yes, Series=AC, Size Code=0603, Stock 1=1533000, Supplier 1="Future Electronics", Termination=SMD/SMT, Width=0.031inch
R6 R11 R12: library part RC0603FR-0733RL, "RES SMD 0603 33 Ohm 1% 1/10W", Case Code (Imperial)=0603, Case Code (Metric)=1608, Manufacturer=Yageo, Max Operating Temperature=155°C, Max Power Dissipation=100mW, Min Operating Temperature=-55°C, Package Quantity=1, Resistance Tolerance=1%, Resistor Type="Thick Film", Supplier Part Number 1=311-33.0HRCT-ND, Temperature Coefficient=100ppm/°C, Voltage Rating=75V, Voltage Rating (DC)=50V, Case/Package=0603, Category="Chip SMD Resistors", ComponentLink1Description=https://datasheet.ciiva.com/11808/0900766b80f96399-11808741.pdf?src-supplier=RSComponents, ComponentLink1URL=https://datasheet.ciiva.com/11808/0900766b80f96399-11808741.pdf?src-supplier=RSComponents, ComponentLink2Description=https://datasheet.ciiva.com/2453/pyu-r-int-thick-7-2453952.pdf?src-supplier=Digi-Key, ComponentLink2URL=https://datasheet.ciiva.com/2453/pyu-r-int-thick-7-2453952.pdf?src-supplier=Digi-Key, ComponentLink3Description=https://datasheet.ciiva.com/2453/pyu-r-int-thick-7-2453953.pdf?src-supplier=Digi-Key, ComponentLink3URL=https://datasheet.ciiva.com/2453/pyu-r-int-thick-7-2453953.pdf?src-supplier=Digi-Key, ComponentLink4Description=https://datasheet.ciiva.com/2453/pyu-r-int-thick-7-2453954.pdf?src-supplier=Digi-Key, ComponentLink4URL=https://datasheet.ciiva.com/2453/pyu-r-int-thick-7-2453954.pdf?src-supplier=Digi-Key, ComponentLink5Description=https://datasheet.ciiva.com/7660/38590-7660792.pdf?src-supplier=Element14, ComponentLink5URL=https://datasheet.ciiva.com/7660/38590-7660792.pdf?src-supplier=Element14, ComponentLink6Description=https://datasheet.ciiva.com/15189/getdatasheetpartid-326673-15189708.pdf?src-supplier=Verical, ComponentLink6URL=https://datasheet.ciiva.com/15189/getdatasheetpartid-326673-15189708.pdf?src-supplier=Verical, ComponentLink7Description=https://datasheet.ciiva.com/7746/443971-7746334.pdf?src-supplier=Element14, ComponentLink7URL=https://datasheet.ciiva.com/7746/443971-7746334.pdf?src-supplier=Element14, ComponentLink8Description=https://datasheet.ciiva.com/7746/443971-7746335.pdf?src-supplier=Element14, ComponentLink8URL=https://datasheet.ciiva.com/7746/443971-7746335.pdf?src-supplier=Element14, ComponentLink9Description=https://datasheet.ciiva.com/46395/443971-46395007.pdf?src-supplier=Element14, ComponentLink9URL=https://datasheet.ciiva.com/46395/443971-46395007.pdf?src-supplier=Element14, Construction=Rectangular, Depth=0.8mm, Features="Moisture Resistant", Height=0.45mm, Lead Free="Lead Free", Lead Pitch=0.3mm, Length=1.6mm, Manufacturer Part Number=RC0603FR-0733RL, Military Standard=Not, Number of Pins=2, Number of Terminations=2, Packaging="Tape and Reel", Power Rating=100mW, Pricing 1="1=0.10000, 10=0.02400, 100=0.00970, 1000=0.00436, 2500=0.00378 (USD)", REACH SVHC="No SVHC", Resistance=33R, RoHS=Yes, RoHS Compliant=Yes, Series=RC, Size Code=0603, Stock 1=41, Supplier 1=Digi-Key, Technology="THICK FILM", Termination=SMD/SMT, Tolerance=1%, Weight=7.1E-05oz, Width=0.8mm
R7: library part RC0603JR-07330RL, "RES  SMD 330R 100 mW 0603", Case Code (Imperial)=0603, Case Code (Metric)=1608, Manufacturer=Yageo, Max Operating Temperature=155°C, Max Power Dissipation=100mW, Min Operating Temperature=-55°C, Package Quantity=5000, Resistance Tolerance=5%, Resistor Type="Thick Film", Supplier Part Number 1=311-330GRCT-ND, Temperature Coefficient=100ppm/°C, Voltage Rating=50V, Case/Package=0603, Category="Chip SMD Resistors", Construction=Rectangular, Depth=0.8mm, Features="Moisture Resistant", Height=0.45mm, Lead Free="Lead Free", Length=1.6mm, Manufacturer Part Number=RC0603JR-07330RL, Military Standard=Not, Number of Pins=2, Number of Terminations=2, Packaging="Tape and Reel", Power Rating=100mW, Pricing 1="1=0.10000, 10=0.02000, 100=0.00800, 1000=0.00360, 2500=0.00312 (USD)", REACH SVHC="No SVHC", Resistance=330R, RoHS=Yes, RoHS Compliant=Yes, Series=RC, Size Code=0603, Stock 1=1074593, Supplier 1=Digi-Key, Termination=SMD/SMT, Tolerance=5%, Voltage Rating (DC)=50V, Width=0.8mm
R8 R10 R17 R40: library part RC0603FR-071KL, "RES SMD 1K OHM 1% 1/10W 0603", Case Code (Imperial)=0603, Case Code (Metric)=1608, Manufacturer=Yageo, Max Operating Temperature=155°C, Min Operating Temperature=-55°C, Power Rating=100mW, Resistance=1kR, Supplier Part Number 1=311-1.00KHRDKR-ND, Temperature Coefficient=100ppm/°C, Tolerance=1%, Voltage Rating=50V, Case/Package=0603, ComponentLink1Description=https://www.verical.com/server-webapp/html/getDatasheet?partID=409289&src-supplier=Verical, ComponentLink1URL=https://www.verical.com/server-webapp/html/getDatasheet?partID=409289&src-supplier=Verical, ComponentLink2Description=http://documents.rs-components.com/techlib://itc_doclist_GB.htm?stockno=5048928&src-supplier=RSComponents, ComponentLink2URL=http://documents.rs-components.com/techlib://itc_doclist_GB.htm?stockno=5048928&src-supplier=RSComponents, ComponentLink3Description=http://www.yageo.com/documents/recent/PYu-RC0603_51_RoHS_L_4.pdf?src-supplier=Avnet+Europe, ComponentLink3URL=http://www.yageo.com/documents/recent/PYu-RC0603_51_RoHS_L_4.pdf?src-supplier=Avnet+Europe, ComponentLink4Description=http://www.farnell.com/datasheets/2167052.pdf?src-supplier=Element14, ComponentLink4URL=http://www.farnell.com/datasheets/2167052.pdf?src-supplier=Element14, ComponentLink5Description=http://www.farnell.com/datasheets/1868787.pdf?src-supplier=Element14, ComponentLink5URL=http://www.farnell.com/datasheets/1868787.pdf?src-supplier=Element14, ComponentLink6Description=http://www.yageo.com/documents/recent/PYu-RC_Group_51_RoHS_L_2.pdf?src-supplier=Avnet, ComponentLink6URL=http://www.yageo.com/documents/recent/PYu-RC_Group_51_RoHS_L_2.pdf?src-supplier=Avnet, ComponentLink7Description=https://www.verical.com/server-webapp/html/getDatasheet?partID=404327&src-supplier=Verical, ComponentLink7URL=https://www.verical.com/server-webapp/html/getDatasheet?partID=404327&src-supplier=Verical, ComponentLink8Description=http://www.farnell.com/datasheets/443971.pdf?src-supplier=Element14, ComponentLink8URL=http://www.farnell.com/datasheets/443971.pdf?src-supplier=Element14, Composition="Thick Film", Contact Plating=Tin,Matte, Depth=0.8mm, Height=0.45mm, Lead Free="Lead Free", Length=1.6mm, Manufacturer Part Number=RC0603FR-071KL, Military Standard=Not, Packaging="Tape and Reel", Pricing 1="1=0.1, 10=0.023, 100=0.0094, 1000=0.0042, 2500=0.0037 (USD)", Radiation Hardening=No, REACH SVHC="No SVHC", Stock 1=21472395, Supplier 1=Digi-Key, Termination=SMD/SMT
R13: library part RT0603CRD0712K1L, "RES SMD 12.1K OHM 1/10W 0603", Case Code (Imperial)=0603, Case Code (Metric)=1608, Manufacturer=Yageo, Max Operating Temperature=125°C, Max Power Dissipation=100mW, Min Operating Temperature=-55°C, Package Quantity=5000, Resistance=12.1kR, Resistor Type="Thin Film", Supplier Part Number 1=RT0603CRD0712K1L-ND, Temperature Coefficient=25ppm/°C, Tolerance=0.25%, Voltage Rating=75V, Voltage Rating (DC)=50V, Case/Package=0603, Category="Chip SMD Resistors", ComponentLink1Description=https://datasheet.ciiva.com/2590/pyu-rt-1-to-0-05-rohs-l-5-2590806.pdf?src-supplier=Digi-Key, ComponentLink1URL=https://datasheet.ciiva.com/2590/pyu-rt-1-to-0-05-rohs-l-5-2590806.pdf?src-supplier=Digi-Key, ComponentLink2Description=https://datasheet.ciiva.com/8891/pyu-rt-1-to-0-05-rohs-l-4-8891049.pdf?src-supplier=Avnet, ComponentLink2URL=https://datasheet.ciiva.com/8891/pyu-rt-1-to-0-05-rohs-l-4-8891049.pdf?src-supplier=Avnet, ComponentLink3Description=https://datasheet.ciiva.com/12721/pyu-rt-1-to-0-05-rohs-l-4-12721018.pdf?src-supplier=Mouser, ComponentLink3URL=https://datasheet.ciiva.com/12721/pyu-rt-1-to-0-05-rohs-l-4-12721018.pdf?src-supplier=Mouser, Contact Plating=Tin,Matte, Height=0.022inch, Lead Free="Lead Free", Length=0.063inch, Manufacturer Part Number=RT0603CRD0712K1L, Number of Terminations=2, Packaging="Tape and Reel", Power Rating=100mW, Pricing 1="5000=0.06299 (USD)", Radiation Hardening=No, RoHS=Yes, RoHS Compliant=Yes, Series=RT, Supplier 1=Digi-Key, Termination=SMD/SMT, Width=0.031inch
R18 R19: library part RC0603FR-07100RL, "RES SMD 100 OHM 1% 1/10W 0603", Case Code (Imperial)=0603, Case Code (Metric)=1608, Manufacturer=Yageo, Max Operating Temperature=155°C, Max Power Dissipation=100mW, Min Operating Temperature=-55°C, Resistance Tolerance=1%, Resistor Type="Thick Film", Temperature Coefficient=100ppm/°C, Voltage Rating=50V, Case/Package=0603, Category="Chip SMD Resistors", Construction=Rectangular, Depth=0.8mm, Features="Moisture Resistant", Height=0.45mm, Lead Free="Lead Free", Length=1.6mm, Manufacturer Part Number=RC0603FR-07100RL, Military Standard=Not, Number of Pins=2, Number of Terminations=2, Packaging="Tape and Reel", Power Rating=100mW, Pricing 1="5000=0.00300, 5000=0.00200, 5000=0.00450, 50000=0.00410, 500000=0.00230, 2500000=0.00140 (USD)", REACH SVHC=Unknown, Resistance=100R, RoHS=Yes, RoHS Compliant=Yes, Series=RC, Size Code=0603, Stock 1=3800000, Supplier 1="Arrow Electronics", Supplier Part Number 1=RC0603FR-07100RL, Technology="THICK FILM", Termination=SMD/SMT, Tolerance=1%, Voltage Rating (DC)=50V, Width=0.8mm
R20: library part RC0603FR-07470RL, "RES SMD 470 OHM 1% 1/10W 0603", Case Code (Imperial)=0603, Case Code (Metric)=1608, Manufacturer=Yageo, Max Operating Temperature=155°C, Max Power Dissipation=100mW, Min Operating Temperature=-55°C, Package Quantity=1, Supplier Part Number 1=311-470HRCT-ND, Temperature Coefficient=100ppm/°C, Tolerance=1%, Voltage Rating=50V, Working Voltage=75V, Case/Package=0603, ComponentLink1Description=http://documents.rs-components.com/techlib://itc_doclist_GB.htm?stockno=5047341&src-supplier=RSComponents, ComponentLink1URL=http://documents.rs-components.com/techlib://itc_doclist_GB.htm?stockno=5047341&src-supplier=RSComponents, ComponentLink2Description=http://www.farnell.com/datasheets/1868787.pdf?src-supplier=Element14, ComponentLink2URL=http://www.farnell.com/datasheets/1868787.pdf?src-supplier=Element14, ComponentLink3Description=http://www.farnell.com/datasheets/2167052.pdf?src-supplier=Element14, ComponentLink3URL=http://www.farnell.com/datasheets/2167052.pdf?src-supplier=Element14, ComponentLink4Description=http://www.yageo.com/documents/recent/PYu-RC_Group_51_RoHS_L_10.pdf?src-supplier=Digi-Key, ComponentLink4URL=http://www.yageo.com/documents/recent/PYu-RC_Group_51_RoHS_L_10.pdf?src-supplier=Digi-Key, Composition="Thick Film", Depth=0.8mm, Features="Moisture Resistant", Height=0.022inch, Lead Free="Lead Free", Length=1.6mm, Manufacturer Part Number=RC0603FR-07470RL, Military Standard=Not, Number of Terminations=2, Packaging="Tape and Reel", Power Rating=100mW, Pricing 1="1=0.1, 10=0.023, 100=0.0094, 1000=0.00421, 2500=0.00366 (USD)", REACH SVHC="No SVHC", Resistance=470R, Stock 1=4530601, Supplier 1=Digi-Key, Termination=SMD/SMT, Width=0.031inch
SB1 SB4 SB5 SB6 SB7: "Solder Bridge ON"
SW1: "SWITCH TACTILE SPST-NO 0.05A 12V", Contact Current Rating=50mA, Contact Resistance=100mR, Insulation Resistance=100MR, Manufacturer=Omron, Max Operating Temperature=70°C, Max Voltage Rating (DC)=12V, Min Operating Temperature=-25°C, Operating Force=1.5N, Package Quantity=1, Ratings="Dust Proof,IP40", Supplier Part Number 1=SW1020DKR-ND, Actuator Length=0.4mm, Actuator Type=Standard, ComponentLink1Description=http://www.farnell.com/datasheets/60838.pdf?src-supplier=Farnell, ComponentLink1URL=http://www.farnell.com/datasheets/60838.pdf?src-supplier=Farnell, ComponentLink2Description=http://www.farnell.com/datasheets/60838.pdf?src-supplier=Element14, ComponentLink2URL=http://www.farnell.com/datasheets/60838.pdf?src-supplier=Element14, ComponentLink3Description=https://omronfs.omron.com/en_US/ecb/products/pdf/en-b3u.pdf?src-supplier=Digi-Key, ComponentLink3URL=https://omronfs.omron.com/en_US/ecb/products/pdf/en-b3u.pdf?src-supplier=Digi-Key, ComponentLink4Description=http://www.omron.com/ecb/products/pdf/en-b3u.pdf?src-supplier=Digi-Key, ComponentLink4URL=http://www.omron.com/ecb/products/pdf/en-b3u.pdf?src-supplier=Digi-Key, ComponentLink5Description=https://www.distrelec.biz/Web/Downloads/he/et/B3U_eng_datasheet.pdf?mime=application%2Fpdf&src-supplier=Distrelec, ComponentLink5URL=https://www.distrelec.biz/Web/Downloads/he/et/B3U_eng_datasheet.pdf?mime=application%2Fpdf&src-supplier=Distrelec, ComponentLink6Description=http://www.onlinecomponents.com/productFiles/mf-OM/en-b3u.pdf?src-supplier=Onlinecomponents.com, ComponentLink6URL=http://www.onlinecomponents.com/productFiles/mf-OM/en-b3u.pdf?src-supplier=Onlinecomponents.com, ComponentLink7Description=https://www.verical.com/server-webapp/html/getDatasheet?partID=552554&src-supplier=Verical, ComponentLink7URL=https://www.verical.com/server-webapp/html/getDatasheet?partID=552554&src-supplier=Verical, ComponentLink8Description=http://www.farnell.com/datasheets/1685550.pdf?src-supplier=Element14, ComponentLink8URL=http://www.farnell.com/datasheets/1685550.pdf?src-supplier=Element14, ComponentLink9Description=http://www.farnell.com/datasheets/2610940.pdf?src-supplier=Farnell, ComponentLink9URL=http://www.farnell.com/datasheets/2610940.pdf?src-supplier=Farnell, ComponentLink10Description=https://www.alliedelec.com/m/d/4c8a9ef82804fc3c241a13c1e298fd73.pdf?src-supplier=Allied+Electronics, ComponentLink10URL=https://www.alliedelec.com/m/d/4c8a9ef82804fc3c241a13c1e298fd73.pdf?src-supplier=Allied+Electronics, Contact Material=Silver, Current Rating=50mA, Depth=2.5mm, Electrical Life=200000Cycles, Height=1.2mm, Illumination Type=Non-Illuminated,Illuminated, Lead Free="Lead Free", Length=4mm, Manufacturer Part Number=B3U-1000P, Max Current Rating=50mA, Mechanical Life=200000Cycles, Mount="Surface Mount", Orientation=Straight, Packaging="Tape and Reel", Pricing 1="1=1, 10=0.961, 25=0.9064, 50=0.7976, 100=0.7251, 250=0.68888, 500=0.67074, 1000=0.52571 (USD)", REACH SVHC=Unknown, Stock 1=116454, Supplier 1=Digi-Key, Switch Function=Off-Mom, Switch Travel=0.15mm, Termination=SMD/SMT, Throw Configuration=SPST, Voltage Rating (DC)=12V, Weight=0.000776oz, Width=3mm
U1: "IC ETHERCAT SLAVE CONTROLLER", Manufacturer=Microchip, Manufacturer Part Number=LAN9255-I/ZMX019, Supplier Part Number 1=150-LAN9255-I/ZMX019-ND, Pricing 1="1=17.76000, 25=16.18480 (USD)", Stock 1=70, Supplier 1=Digi-Key
U2: "IC EEPROM 256KBIT I2C 1MHZ 8SOIC", Case/Package=SOIC, Frequency=400kHz, Manufacturer="ON Semiconductor", Max Operating Temperature=85°C, Max Supply Voltage=5.5V, Min Operating Temperature=-40°C, Min Supply Voltage=1.8V, Nominal Supply Current=3mA, Operating Supply Voltage=5V, Package Quantity=1, Supplier Part Number 1=8080199P, Access Time=900ns, Access Time-Max=900ns, Category=EEPROM, ComponentLink1Description=https://datasheet.ciiva.com/8072/1780696-8072142.pdf?src-supplier=Element14, ComponentLink1URL=https://datasheet.ciiva.com/8072/1780696-8072142.pdf?src-supplier=Element14, ComponentLink2Description=https://datasheet.ciiva.com/46391/1792913-46391371.pdf?src-supplier=Element14, ComponentLink2URL=https://datasheet.ciiva.com/46391/1792913-46391371.pdf?src-supplier=Element14, ComponentLink3Description=https://datasheet.ciiva.com/4859/cat24c256-d-105771-4859816.pdf?src-supplier=Mouser, ComponentLink3URL=https://datasheet.ciiva.com/4859/cat24c256-d-105771-4859816.pdf?src-supplier=Mouser, ComponentLink4Description=https://datasheet.ciiva.com/16427/cat24c256-d-16427973.pdf?src-supplier=Future+Electronics, ComponentLink4URL=https://datasheet.ciiva.com/16427/cat24c256-d-16427973.pdf?src-supplier=Future+Electronics, Contact Plating=Gold, Density=256Kb, Halogen Free="Halogen Free", Height=1.5mm, Interface=I2C,Serial,2-Wire, Lead Free="Lead Free", Length=5mm, Manufacturer Part Number=CAT24C256WI-GT3, Max Frequency=400kHz, Memory Size=256Kb, Memory Type=EEPROM, Mount="Surface Mount", Number of Pins=8, Number of Words=32000, Organization=32KX8, Packaging="Tape and Reel", Pricing 1="100=0.19900, 200=0.19400, 500=0.18900, 1000=0.18400 (GBP)", Radiation Hardening=No, REACH SVHC="No SVHC", RoHS=Yes, RoHS Compliant=Yes, Series=-, Stock 1=300, Supplier 1=RSComponents, Supply Current=3mA, Supply Voltage-Nom=5.5V, Width=4mm, Write Cycle Time-Max (tWC)=5ms, Write Protection=YES
U3: "IC TRNSLTR BIDIRECTIONAL US8", Case/Package=VSSOP, High Level Output Current=-20uA, Low Level Output Current=20uA, Manufacturer="Texas Instruments", Max Operating Temperature=85°C, Max Supply Voltage=5.5V, Min Operating Temperature=-40°C, Min Supply Voltage=1.65V, Output Current=50mA, Package Quantity=1, Category="Integrated Circuits (ICs)", ComponentLink1Description=https://datasheet.ciiva.com/4226/sces641b-4226901.pdf?src-supplier=Arrow+Electronics, ComponentLink1URL=https://datasheet.ciiva.com/4226/sces641b-4226901.pdf?src-supplier=Arrow+Electronics, ComponentLink2Description=https://datasheet.ciiva.com/15096/getdatasheetpartid-226009-15096242.pdf?src-supplier=Verical, ComponentLink2URL=https://datasheet.ciiva.com/15096/getdatasheetpartid-226009-15096242.pdf?src-supplier=Verical, ComponentLink3Description=https://datasheet.ciiva.com/14287/txb0102-14287498.pdf?src-supplier=Avnet, ComponentLink3URL=https://datasheet.ciiva.com/14287/txb0102-14287498.pdf?src-supplier=Avnet, ComponentLink4Description=https://datasheet.ciiva.com/14287/txb0102-14287370.pdf?src-supplier=Avnet, ComponentLink4URL=https://datasheet.ciiva.com/14287/txb0102-14287370.pdf?src-supplier=Avnet, ComponentLink5Description=https://datasheet.ciiva.com/6619/txb0102-6619255.pdf?src-supplier=Digi-Key, ComponentLink5URL=https://datasheet.ciiva.com/6619/txb0102-6619255.pdf?src-supplier=Digi-Key, ComponentLink6Description=https://datasheet.ciiva.com/6619/txb0102-6619256.pdf?src-supplier=Digi-Key, ComponentLink6URL=https://datasheet.ciiva.com/6619/txb0102-6619256.pdf?src-supplier=Digi-Key, ComponentLink7Description=https://datasheet.ciiva.com/6619/txb0102-6619257.pdf?src-supplier=Digi-Key, ComponentLink7URL=https://datasheet.ciiva.com/6619/txb0102-6619257.pdf?src-supplier=Digi-Key, Contact Plating=Gold, Data Rate=100Mbps, Height=0.85mm, Lead Free="Lead Free", Length=2.3mm, Logic Function=Translator, Manufacturer Part Number=TXB0102DCUT, Mount="Surface Mount", Number of Bits=2, Number of Channels=2, Number of Inputs=2, Number of Pins=8, Output Type=3-STATE, Packaging="Tape and Reel", Pricing 1="1=0.79330, 10=0.66470, 25=0.65820, 250=0.37450, 500=0.36200, 1000=0.29770, 2500=0.28440 (USD)", Propagation Delay=31ns, Radiation Hardening=No, REACH SVHC="No SVHC", RoHS=Yes, RoHS Compliant=Yes, Series=-, Stock 1=10, Supplier 1="Arrow Electronics", Supplier Part Number 1=TXB0102DCUT, Turn-On Delay Time=7.4ns, Weight=0.000339oz, Width=2mm
U4: "MAGNETIC ANGLE SENSOR", Manufacturer=Infineon, Manufacturer Part Number=TLE5012BE5000, Package Quantity=2500, Supplier Part Number 1=2238590, Category="Magnetic Sensors", ComponentLink1Description=http://www.mouser.com/ds/2/196/Infineon-TLE5012B_Exxxx-DS-v02_00-en-540142.pdf?src-supplier=Mouser, ComponentLink1URL=http://www.mouser.com/ds/2/196/Infineon-TLE5012B_Exxxx-DS-v02_00-en-540142.pdf?src-supplier=Mouser, Interface=SPI,PWM, Number of Pins=8, Packaging="Tape and Reel", RoHS=Yes, RoHS Compliant=Yes, Series=TLE5012, Supplier 1=RSComponents
X1: "CRYSTAL 25.0000MHZ 8PF SMD", Manufacturer="Aker Technology USA", Package=Custom, Manufacturer Part No=C3E-25.000-8-1015-X-M
X2: "Crystal 32.768KHZ 6.0PF SMD", Manufacturer="Micro Crystal", Supplier Part Number 1=2195-CM8V-T1A-32.768KHZ-6PF-20PPM-TA-QCCT-ND, Manufacturer Part Number=CM8V-T1A-32.768KHZ-6PF-20PPM-TA-QC, Pricing 1="1=0.68000, 10=0.56400, 50=0.50740, 100=0.45100, 500=0.42844 (USD)", RoHS=No, Stock 1=21000, Supplier 1=Digi-Key

## Via types
v1: diameter 23.62, hole 11.81, Top Layer to Bottom Layer, tented both sides, 131 vias
v2: diameter 23.62, hole 11.81, Top Layer to Bottom Layer, 9 vias
v3: diameter 125.98, hole 125.98, Top Layer to Bottom Layer, 4 vias

## Nets (pads, with @x,y where several pads share a name; then routed paths per layer and width w, separated by ;. In a path a pad name is that pad's centre, name@x,y a point inside that pad or via, vN(x,y) a via of type N, cw(c..) or ccw(c..) an arc to the next point about the centre after c; other vN are vias at no path point)
#UART_RX: J3.26 U3.1 | length 215.6
  Bottom Layer w8: v1(302,-61) 302,98 313,109 U3.1@354.05,109
#UART_TX: J3.24 U3.8 | length 39
  Bottom Layer w8: U3.8@232,109 v1(271,109)
CLK_25: R6.1 U1.98 | length 1815.8
  Top Layer w8: v1(145,1023.19) 191.81,1023.19 300.54,914.46 U1.98@614.52,914.46
  Bottom Layer w8: 104.09,622 104.09,591.51 223.59,472 793.56,472 824,441.56 R6.1@824,371
  Bottom Layer w10: 104.09,622 104.09,982.27 v1(145,1023.19)
DIAG: J3.19 U1.11 | length 948.8
  Top Layer w8: v1(459.83,141.73) 785.95,141.73 808,163.79 808,318 831.12,341.12 831.12,382.91 U1.11@831.06,382.97
  Bottom Layer w22: v1(206,278) 413,278 459.83,231.18 v1(459.83,141.73)
DIR: J3.20 U1.2 | length 504.5
  Top Layer w8: J3.20@346.66,280 428.45,280 472.14,236.31 684.31,236.31 689.32,241.32 U1.2@689.32,382.97
EEPSIZE: R7.2 U1.89 | length 1976.2
  Top Layer w8: 777,1080 783.75,1073.25 783.75,989.33 U1.89@783.81,989.27
  Top Layer w10: v1(-177,783) -177,1279 -35,1421 607,1421 721,1307 721,1136 777,1080
  Bottom Layer w25: v1(-177,783) -141,783 -119,761 R7.2@-119,695.72
ENC_CS: R18.2 U1.46 | length 354
  Top Layer w8: v1(1169.81,649) 1172,646.81 1224.69,646.81 U1.46@1224.76,646.75
  Bottom Layer w8: R18.2@923,593 923,641 931,649 v1(1169.81,649)
ENC_DATA: R20.2 U1.43 U1.47 | length 480.5
  Top Layer w8: v1(1150,586) 1172.76,586 1186.2,599.44 1224.69,599.44 1224.76,599.5 1300.5,599.5 1316,615 1316,647 1300.5,662.5 U1.47@1224.76,662.5
  Bottom Layer w22: R20.2@995,543 1107,543 v1(1150,586)
ENC_SCK: R19.2 U1.44 | length 425.5
  Top Layer w8: v1@1169.84,615.28 U1.44@1224.72,615.28
  Bottom Layer w8: R19.2@897,655 897,579 905,571 1013,571 1057.32,615.32 v1(1169.81,615.32)
ERRLED: R8.2 U1.17 | length 820
  Top Layer w8: U1.17@925.54,382.97 925.61,382.91 925.61,336.97 931.58,331 v1(950,331)
  Bottom Layer w22: v1(950,331) 950,353 969,372 1083,372 1103,352 1103,-69 1168,-134 R8.2@1168,-177
GND: C1.2 C2.2 C3.2 C4.2 C5.2 C6.2 C7.2 C8.2 C9.2 C10.2 C11.2 C12.2 C13.2 C14.2 C15.2 C16.2 C17.2 C18.2 C19.2 C20.2 C21.2 C22.2 C23.2 C24.2 C25.2 C26.2 C27.1 C28.1 C29.2 C30.2 C31.2 C32.1 C33.1 C34.2 C35.2 C41.2 J1.5 J2.6 J3.23 J3.25 P6.1 R2.1 R3.1 R4.1 R13.1 R14.1 R17.2 SW1.2 U1.6 U1.15 U1.129 U2.1 U2.2 U2.3 U2.4 U3.2 U4.7 X1.2 X1.4 | length 5000.5
  Top Layer w8: 583.5,1056 589,1056 655,990 655,941 671,925 v1(690,925) ; U1.6@752.31,382.97 752.31,429.57 798.55,475.81 958.45,475.81 963.95,470.31 971.81,462.45 971.81,433.81 962.71,424.71 907.97,424.71 894,410.74 894,382.97 894.05,382.92 894.05,321.95 916,300 916,289 ; U1.129@896.02,660.53 U1.129@919.64,684.15 ; 1348,666 1348,649 1351,646
  Top Layer w15: 916,265 916,289
  Top Layer w22: v1@478.37,1128.63 486,1128.63 J1.5@503,1145.63 ; 916,223 916,265
  Top Layer w40: v1(-153,259) P6.1@-153,351 ; 1,860 v1(1,210) 1,87 3,85
  Bottom Layer w8: U3.2@354.05,89.31 377.41,89.31 382.1,94 382.1,150.63
  Bottom Layer w22: 672,925 v1(690,925) 733.46,925 757,901.46 757,833 ; v1(1135,74) 1135,370
  Bottom Layer w40: R17.2@-121,631 -121,516 -171,466 -171,277 v1(-153,259) -107,213 300,213 ; v1(47,837) 47,604.75 211.25,440.5 v1(446,440.5) ; 213,655 210.19,657.81 210.19,1112.37 234.82,1137 452,1137 ; 356,157 395,157 ; 409,1135 452.5,1091.5 452.5,1035.5 ; 952.54,-114 957,-109.54 v1(957,153)
  other v1: 955,-42 955,-12 955,19 831,144 831,174 1283,263 636.46,279.31 1283,294 514,366 514,397 1348,683 436,685 1283,777 786,830 857,837 893,837 1239,975 1239,1006 628,1110 477,1138 505,1138 475.38,1223.73 503.38,1223.73 269,1234
  other v3: 0,0 1220.47,0 0,1220.47 1220.47,1220.47
LINK0: J3.16 R4.2 SB7.1 U1.95 | length 1900.1
  Top Layer w8: v1(42,446) 42.62,446.62 217.35,446.62 250.72,480 J3.16@346.66,480 ; v1(689,1070) 689.39,1069.61 U1.95@689.39,989.33
  Bottom Layer w22: v1(42,446) -24,512 -24,985.01 170.99,1180 574.5,1180 SB7.1@578.5,1176 ; SB7.1@585,1180 581,1176 SB7.1@578.5,1176 ; 683,1041 584.89,1041 572,1053.89 572,1163.11 578.5,1169.61 SB7.1@578.5,1176
LINK1: J3.17 R3.2 SB6.1 U1.90 | length 2266.8
  Top Layer w8: v1(685,1120) 707.35,1120 768.13,1059.22 U1.90@768.13,989.33
  Top Layer w22: v1(639,1176) v1(639,1348)
  Bottom Layer w22: v1(71,350) 32,350 -82,464 -82,1012 254,1348 v1(639,1348) ; v1(639,1176) 683,1176 SB6.1@687,1180 SB6.1@691,1176 ; 714.5,1139.5 718,1136 ; 733,1130.5 834.11,1130.5 847,1117.61 R3.2@847,989
NetJ1_1: J1.1 R41.1 SB4.2 | length 98
  Top Layer w22: J1.1@886,1179 v1(886,1277)
NetJ1_2: J1.2 SB5.2 | length 98
  Top Layer w22: J1.2@786,1179 v1(786,1277)
NetJ1_3: J1.3 SB6.2 | length 98
  Top Layer w22: J1.3@686,1179 v1(686,1277)
NetJ1_4: J1.4 SB7.2 | length 98
  Top Layer w22: J1.4@586,1179 v1(586,1277)
NetL6_1: L6.1 U1.114 | length 295.1
  Top Layer w8: U1.114@614.52,662.5 652.5,662.5 v1(676,639)
  Bottom Layer w8: 594,802 594,675 630,639 v1(676,639)
NetLED1_2: LED1.2 R7.1
  other v1: -165,730
NetLED2_2: LED2.2 R8.1 | length 82.6
  Top Layer w20: LED2.2@1106.5,-180 v2(1106.5,-137.5)
  Bottom Layer w20: R8.1@1106,-177 v2@1106,-139 ; v2(1106.5,-137.5) v2@1108,-139
NetLED3_2: LED3.2 R17.1 | length 1
  Top Layer w22: v1@-165,598 v1(-165,599)